# EAGLE board Qwiic-GPS-RTK2---ublox-ZED-F9P-Panel (EAGLE 9.6.0), part 1 of 3
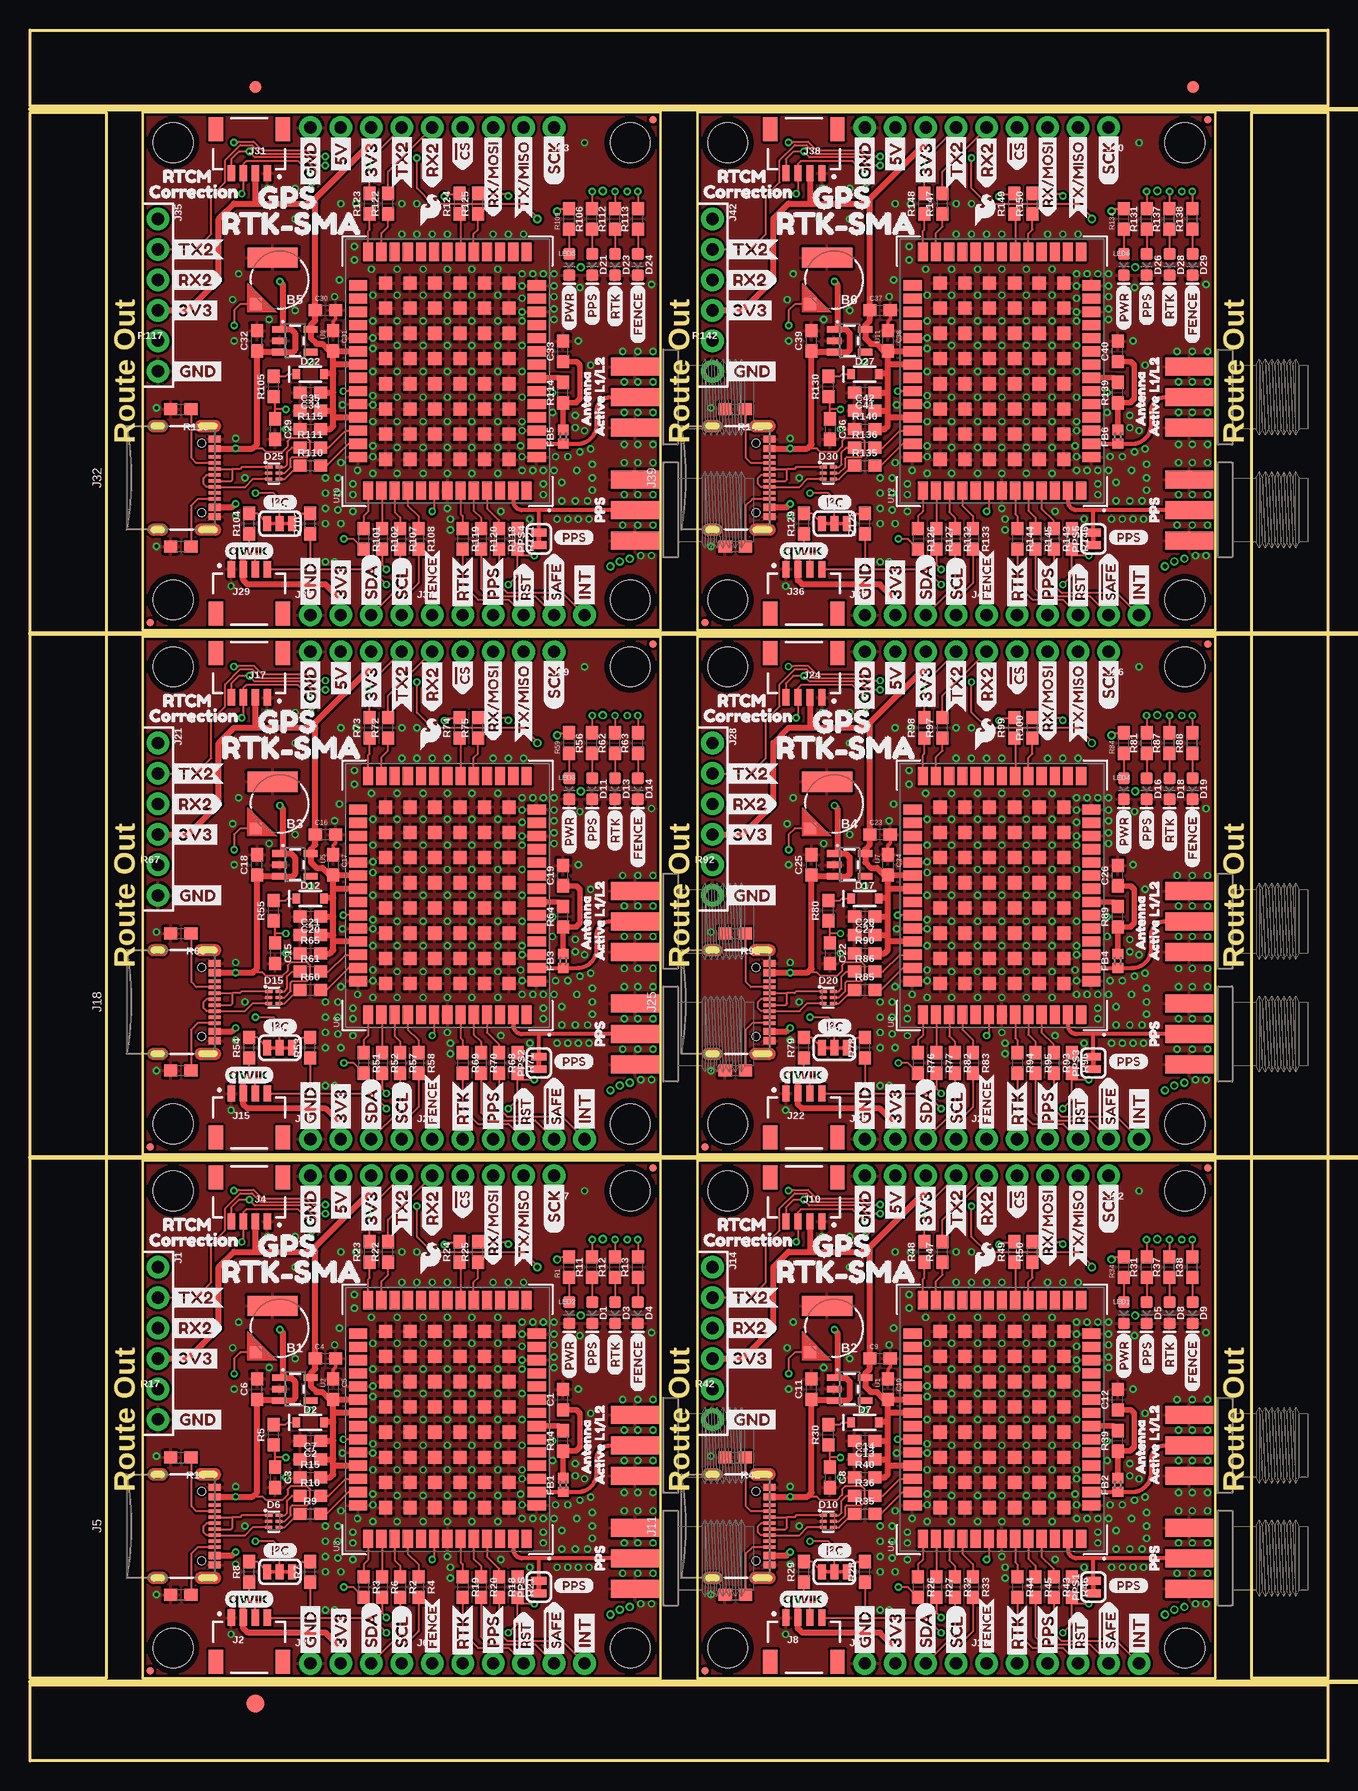
[diagram p0: board, top side]
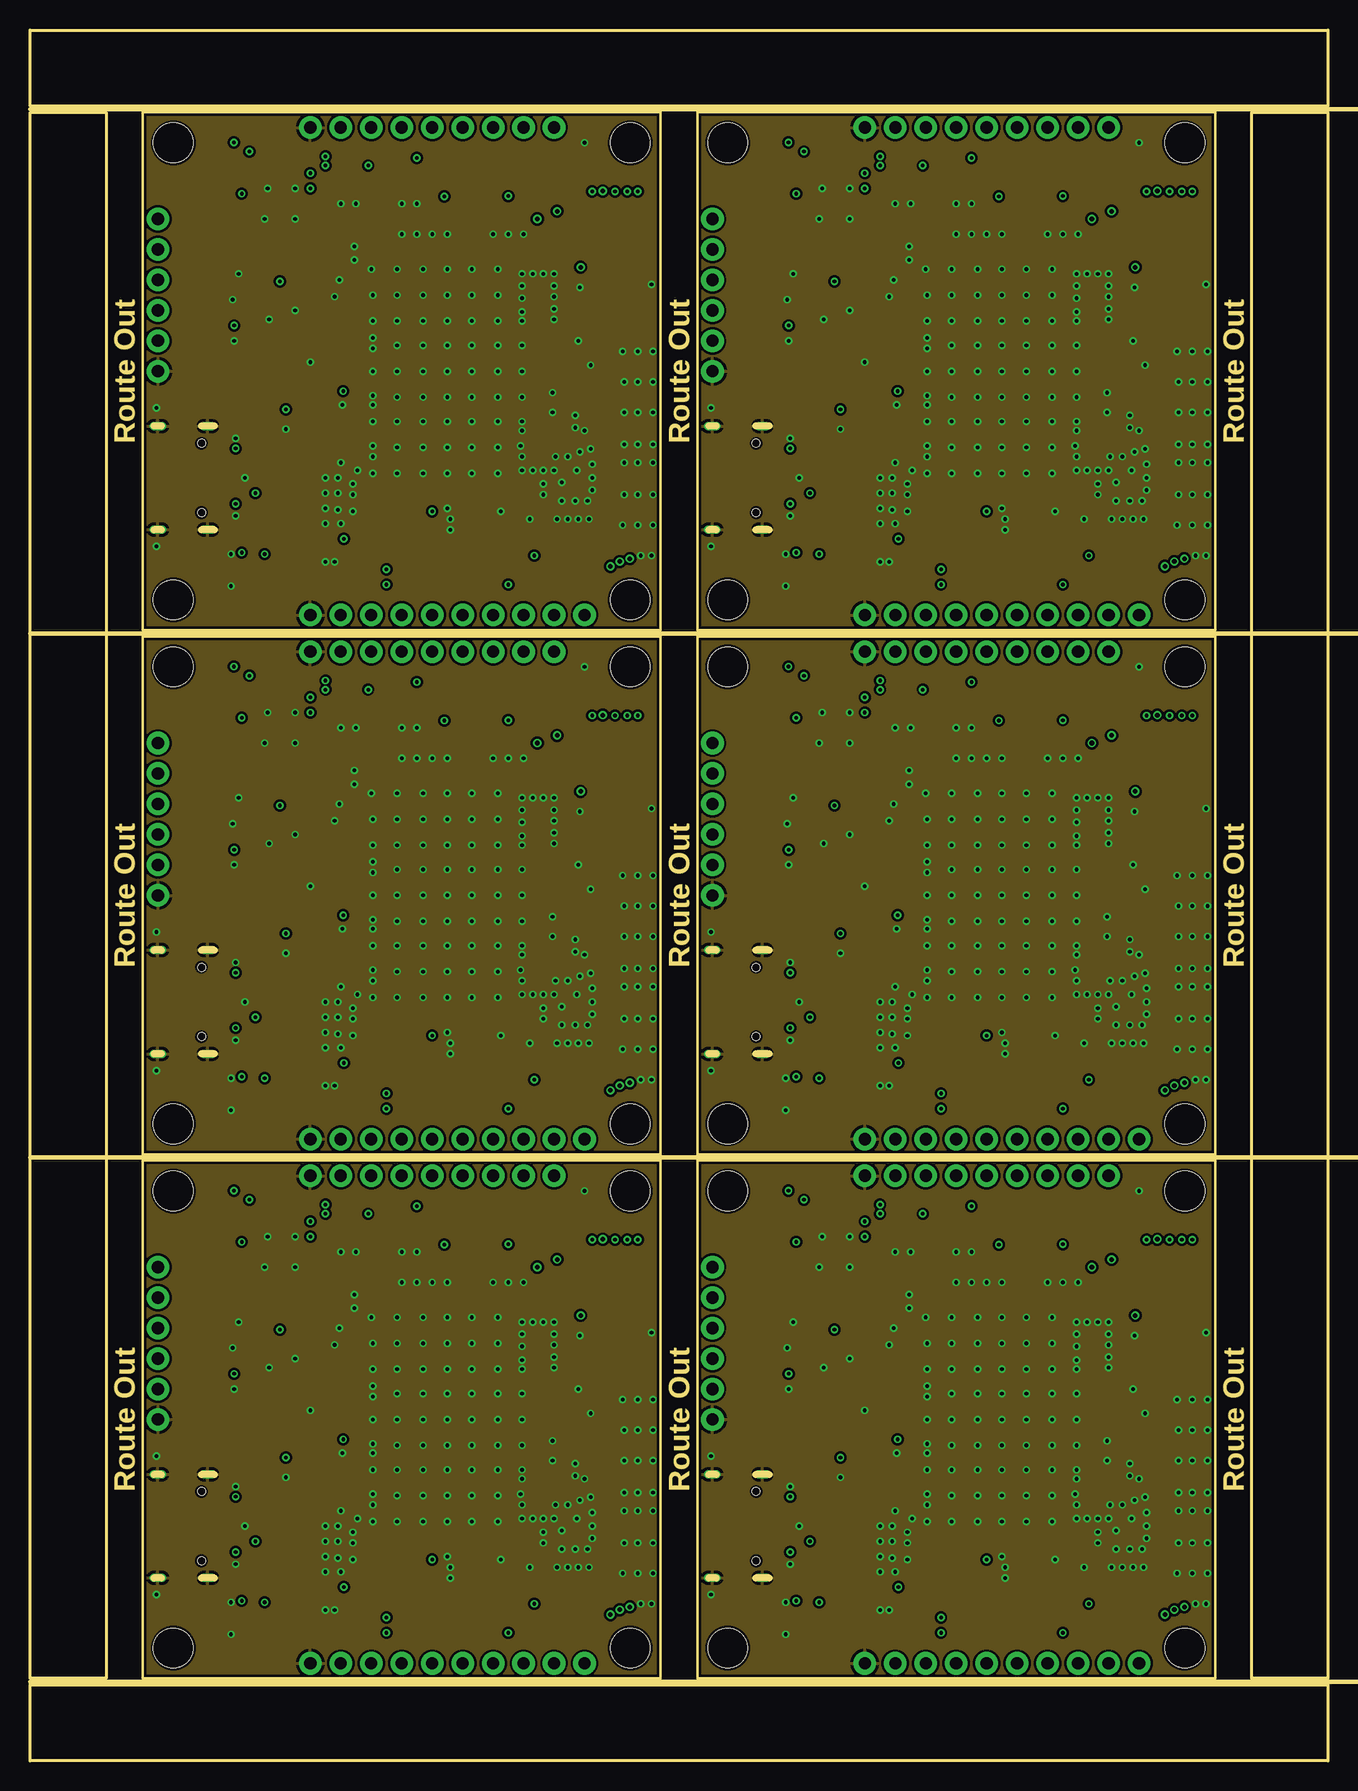
[diagram p1: board, inner layer Route2]
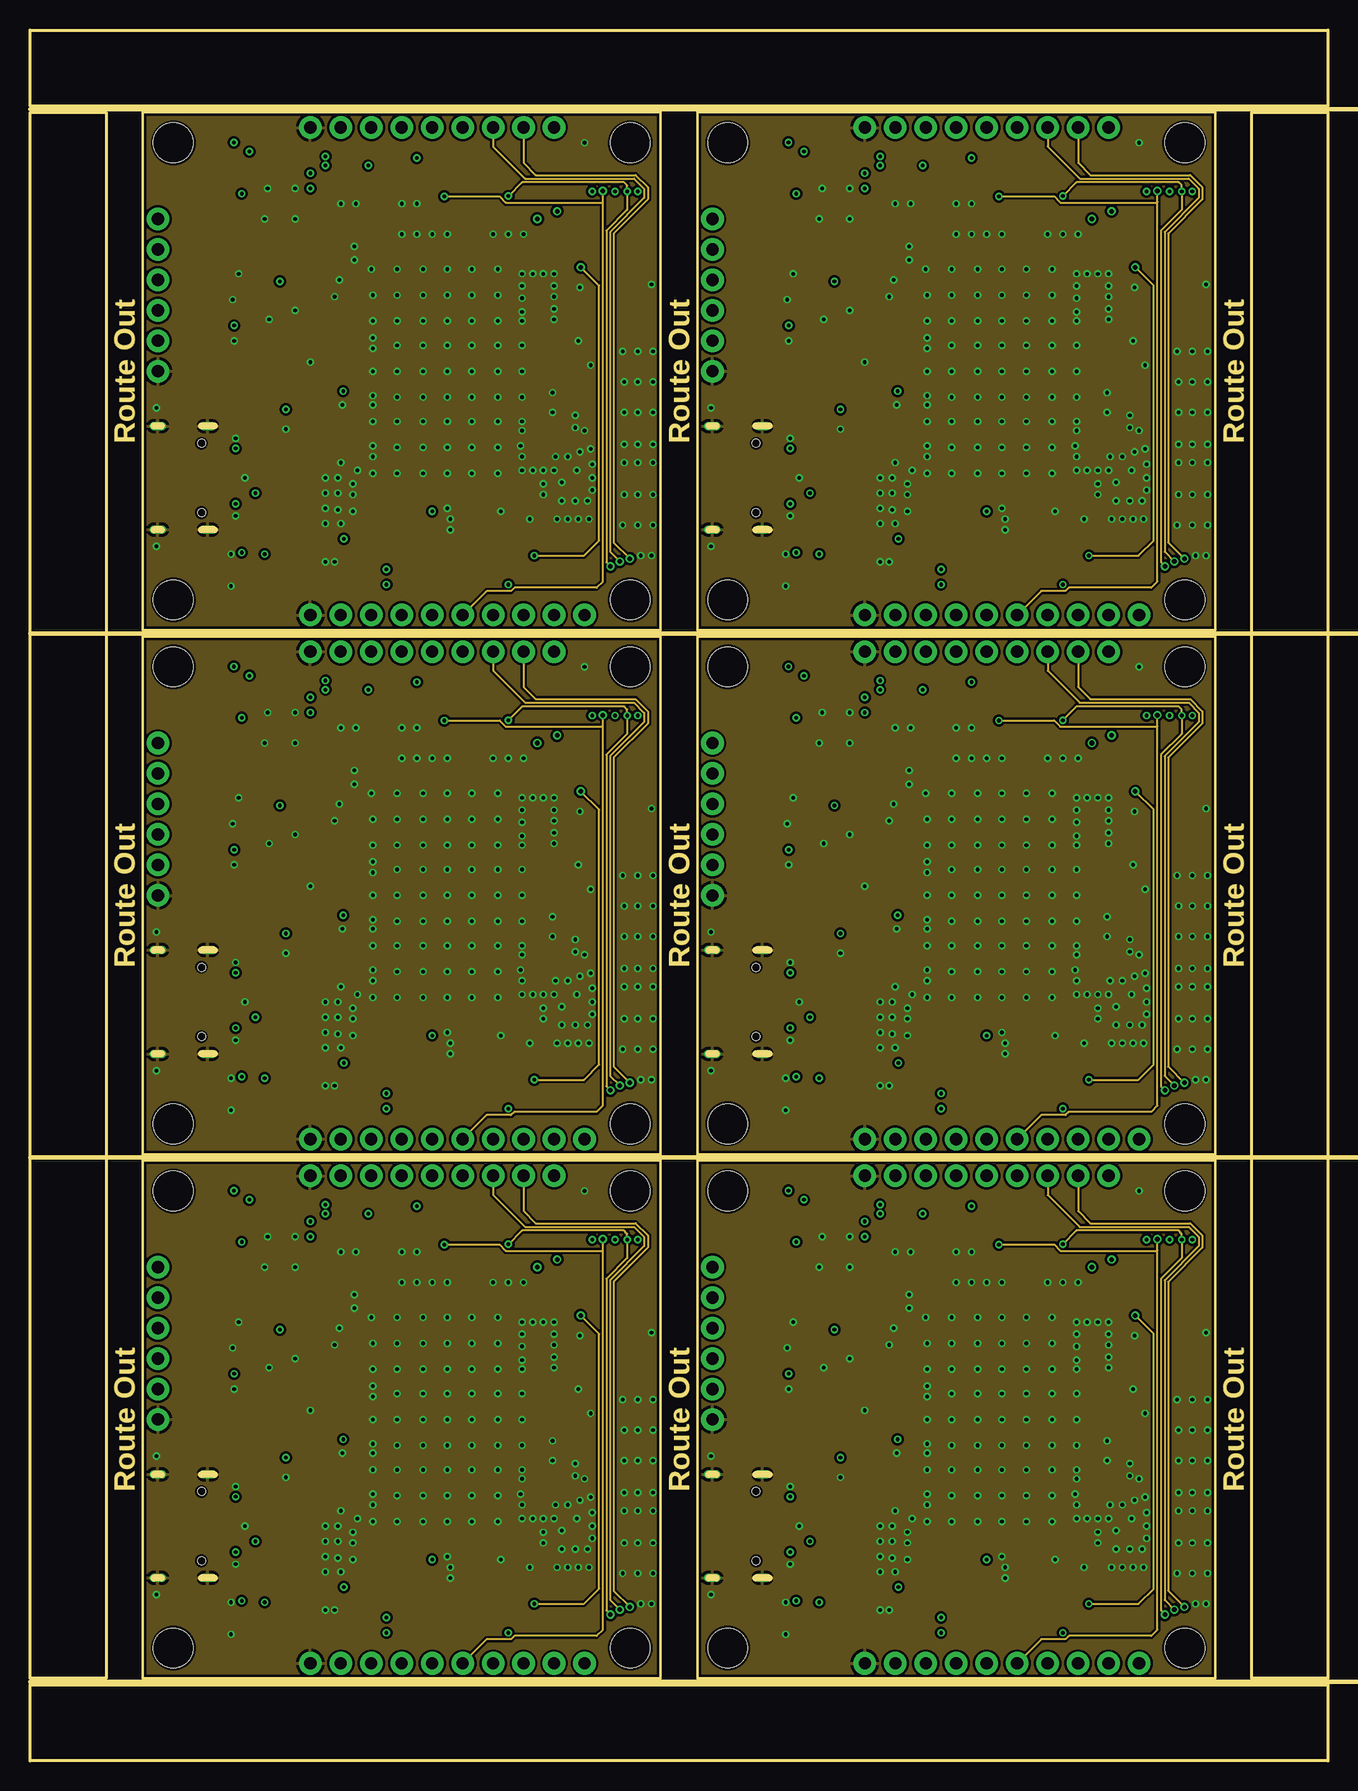
[diagram p2: board, inner layer Route15]
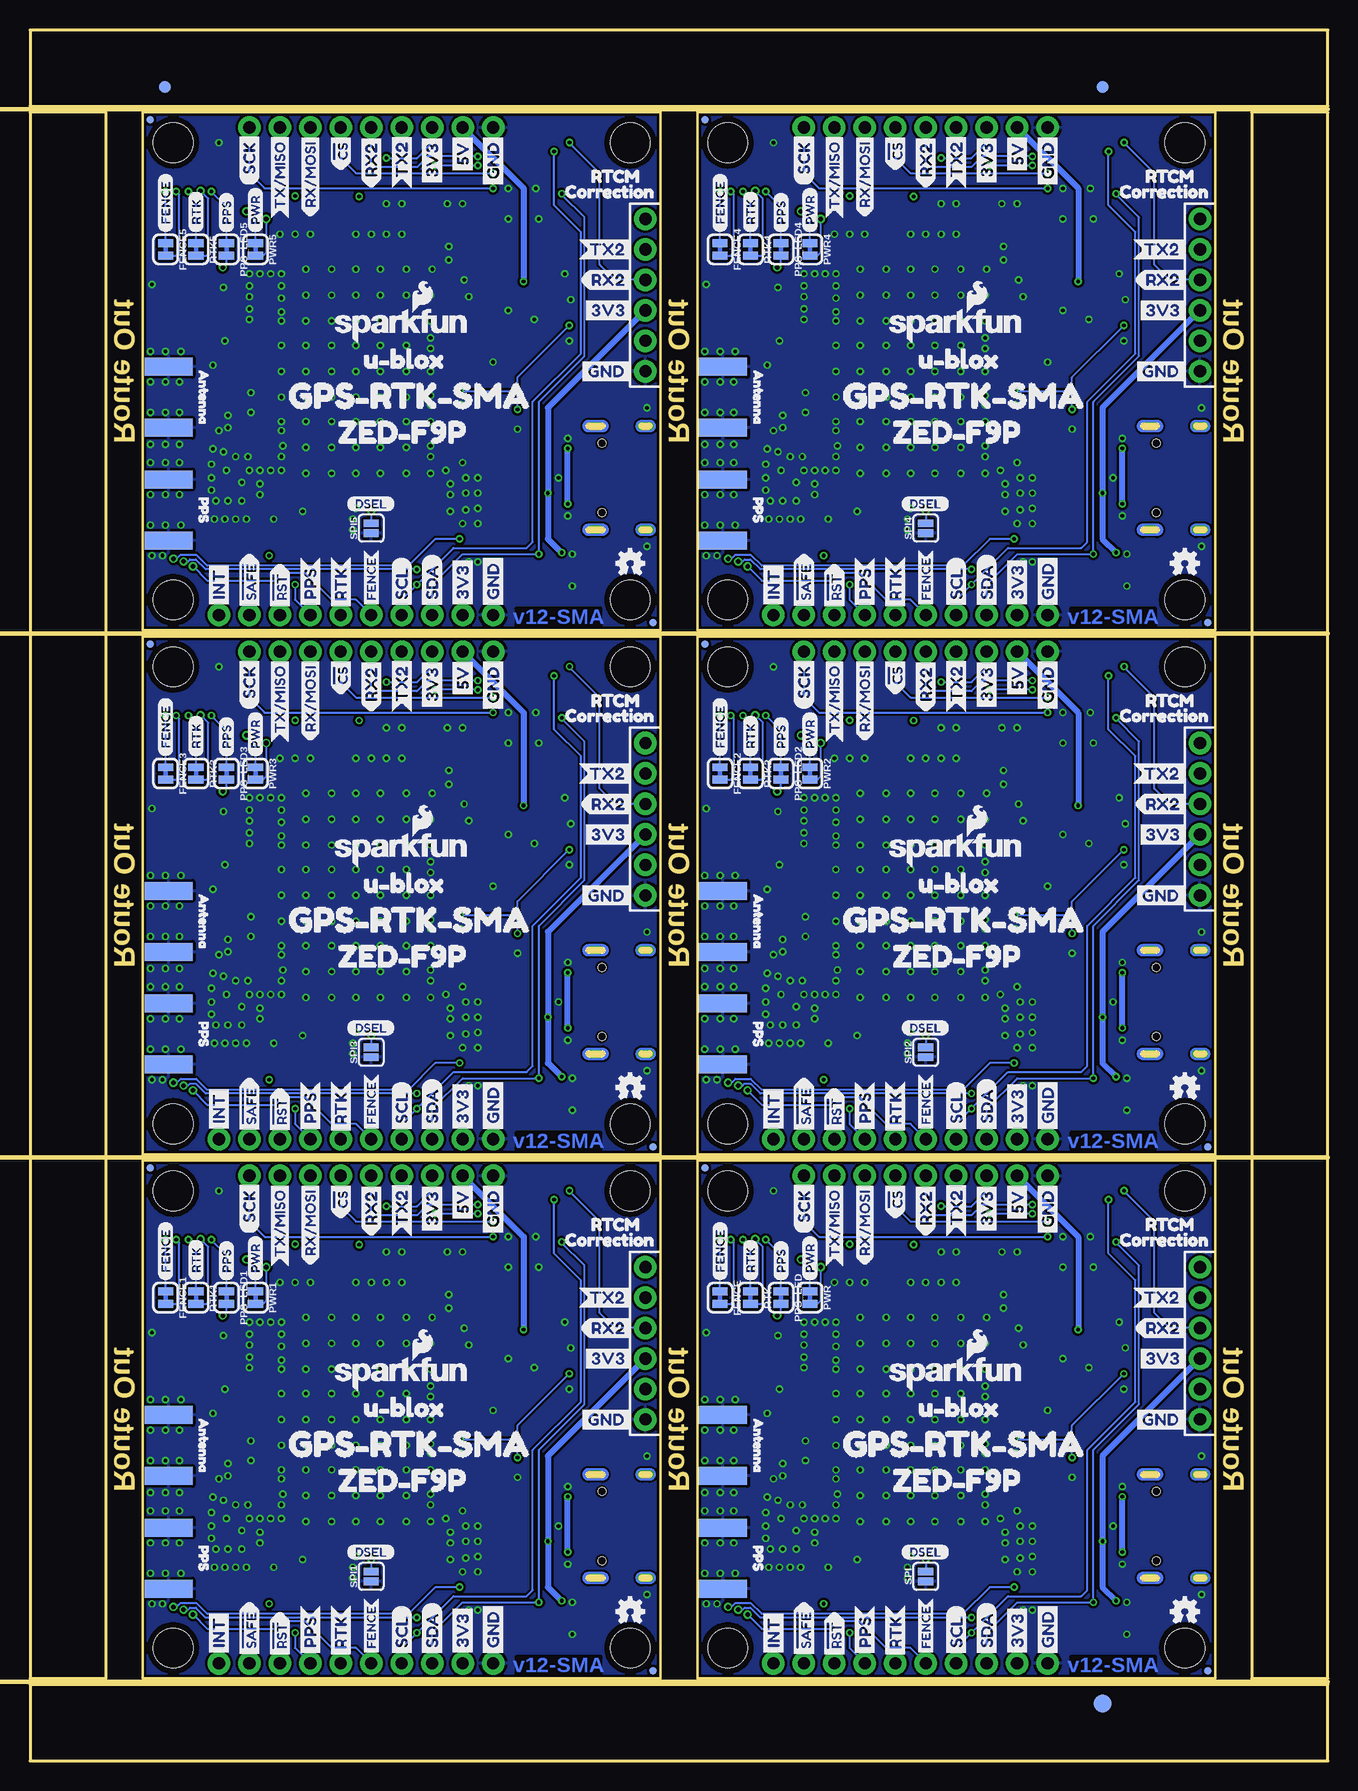
[diagram p3: board, bottom side, seen from below]

Size 108.2 x 144.27 mm. Coordinates in mm from the lower left corner, seen from the top.
Outline: 52.58,6.86 9.4,6.86 9.4,50.04 52.58,50.04 52.58,6.86
Outline: 98.81,6.86 55.63,6.86 55.63,50.04 98.81,50.04 98.81,6.86
Outline: 52.58,50.55 9.4,50.55 9.4,93.73 52.58,93.73 52.58,50.55
Outline: 98.81,50.55 55.63,50.55 55.63,93.73 98.81,93.73 98.81,50.55
Outline: 52.58,94.23 9.4,94.23 9.4,137.41 52.58,137.41 52.58,94.23
Outline: 98.81,94.23 55.63,94.23 55.63,137.41 98.81,137.41 98.81,94.23
Outline: 0,6.35 108.2,6.35 108.2,0 0,0 0,6.35
Outline: 101.85,137.41 108.2,137.41 108.2,6.86 101.85,6.86 101.85,137.41
Outline: 0,144.27 108.2,144.27 108.2,137.92 0,137.92 0,144.27
Outline: 0,137.41 6.35,137.41 6.35,6.86 0,6.86 0,137.41
Copper layers (1+2*15+16): Top 0.035mm / dielectric 1.5mm / Route2 0.035mm / dielectric 0.15mm / Route15 0.035mm / dielectric 0.2mm / Bottom 0.035mm
Design rules "Qwiic": minimum track width 4mil, minimum drill 0.2mm, track to track 4mil, track to pad 4mil, pad to pad 4mil, via to via 4mil, smd to smd 4mil, copper to edge 6mil, drill to drill 6mil, minimum pad ring 6mil, minimum via ring 6mil, stop-mask expansion 4mil, vias tented up to drill 25mil, thermal gap 10mil
Net classes: 3 RF: width 0.35 mm, clearance 0.203 mm
Milling: 4 lines

## Footprints (pad centres in the part's own frame; a part is rotated, then mirrored left to right if it is on the bottom)
ML414H_IV01E = smd 1 x 1: + 2.022,2.032 | smd 4.2 x 1.7: - 0.6,-1.85
0603 = smd 1.1 x 1: 1 -0.85,0; 2 0.85,0
LED-0603 = smd 1 x 1: A -0.877,0; C 0.877,0
SOD-323 = smd 0.63 x 0.83: A 1.15,0; C -1.15,0
SOT886 = smd 0.61 x 0.25: 1 -0.405,0.5 | smd 0.56 x 0.25: 2 -0.43,0; 3 -0.43,-0.5; 4 0.43,-0.5; 5 0.43,0; 6 0.43,0.5
SMA-EDGE = smd 1.5 x 4: GND@0 -2.54,0; GND@1 2.54,0; SIG 0,0 | smd 1.5 x 4 bottom: GND@2 -2.54,0; GND@3 2.54,0
FIDUCIAL-1X2 = smd 1 x 1: 1 0,0
FIDUCIAL-1.5X3 = smd 1.5 x 1.5: 1 0,0
0402 = smd 0.85 x 0.9: 1 -0.58,0; 2 0.58,0
SMT-JUMPER_2_NC_TRACE_SILK = smd 0.66 x 1.27: 1 -0.521,0; 2 0.521,0
1X06_NO_SILK = drill 1.016 pad 1.88: 1 0,0; 2 2.54,0; 3 5.08,0; 4 7.62,0; 5 10.16,0; 6 12.7,0
JST04_1MM_RA = smd 0.6 x 1.35: 1 -1.5,0; 2 -0.5,0; 3 0.5,0; 4 1.5,0 | smd 1.2 x 2: NC1 2.8,-3.675; NC2 -2.8,-3.675
1X04_NO_SILK = drill 1.016 pad 1.88: 1 0,0; 2 2.54,0; 3 5.08,0; 4 7.62,0
USB-C-16P-2LAYER-PADS = smd 0.3 x 1: A5 -1.25,-0.34; A6 -0.25,-0.34; A7 0.25,-0.34; A8 1.25,-0.34; B5 1.75,-0.34; B6 0.75,-0.34; B7 -0.75,-0.34; B8 -1.75,-0.34 | smd 0.6 x 1: GND -3.225,-0.34; GND2 3.225,-0.34; VBUS1 -2.45,-0.34; VBUS2 2.45,-0.34 | drill 0.4 pad 0.6 long: SHLD1 -4.318,-0.915; SHLD2 4.318,-0.915; SHLD3 -4.318,-5.095; SHLD4 4.318,-5.095 | hole 0.65: -2.89,-1.445; 2.89,-1.445
1X09_NO_SILK = drill 1.016 pad 1.88: 1 0,0; 2 2.54,0; 3 5.08,0; 4 7.62,0; 5 10.16,0; 6 12.7,0; 7 15.24,0; 8 17.78,0; 9 20.32,0
STAND-OFF = hole 3.302: 0,0
MICRO-FIDUCIAL = smd 0.635 x 0.635: 1 0,0
SMT-JUMPER_3_2-NC_TRACE_SILK = smd 0.66 x 1.27: 1 -1.041,0; 2 0,0; 3 1.041,0
SMT-JUMPER_2_NO_SILK = smd 0.635 x 1.27: 1 -0.406,0; 2 0.406,0
SOT23-5 = smd 0.55 x 1.2: 1 -0.95,-1.3; 2 0,-1.3; 3 0.95,-1.3; 4 0.95,1.3; 5 -0.95,1.3
ZED-F9P = smd 0.85 x 1.52: 1 -7.15,-7.45; 2 -6.05,-7.45; 3 -4.95,-7.45; 4 -3.85,-7.45; 5 -2.75,-7.45; 6 -1.65,-7.45; 7 -0.55,-7.45; 8 0.55,-7.45; 9 1.65,-7.45; 10 2.75,-7.45; 11 3.85,-7.45; 12 4.95,-7.45; 13 6.05,-7.45; 14 7.15,-7.45; 28 7.15,7.45; 29 6.05,7.45; 30 4.95,7.45; 31 3.85,7.45; 32 2.75,7.45; 33 1.65,7.45; 34 0.55,7.45; 35 -0.55,7.45; 36 -1.65,7.45; 37 -2.75,7.45; 38 -3.85,7.45; 39 -4.95,7.45; 40 -6.05,7.45; 41 -7.15,7.45 | smd 1.52 x 0.85: 15 9.95,-6.6; 16 9.95,-5.5; 17 9.95,-4.4; 18 9.95,-3.3; 19 9.95,-2.2; 20 9.95,-1.1; 21 9.95,0; 22 9.95,1.1; 23 9.95,2.2; 24 9.95,3.3; 25 9.95,4.4; 26 9.95,5.5; 27 9.95,6.6; 42 -9.95,6.6; 43 -9.95,5.5; 44 -9.95,4.4; 45 -9.95,3.3; 46 -9.95,2.2; 47 -9.95,1.1; 48 -9.95,0; 49 -9.95,-1.1; 50 -9.95,-2.2; 51 -9.95,-3.3; 52 -9.95,-4.4; 53 -9.95,-5.5; 54 -9.95,-6.6 | smd 1.1 x 1.1: 55 -1.05,-1.05; 56 -3.15,-1.05; 57 -5.25,-1.05; 58 -7.35,-1.05; 59 -1.05,-3.1; 60 -3.15,-3.1; 61 -5.25,-3.1; 62 -7.35,-3.1; 63 -1.05,-5.15; 64 -3.15,-5.15; 65 -5.25,-5.15; 66 -7.35,-5.15; 67 -1.05,5.15; 68 -3.15,5.15; 69 -5.25,5.15; 70 -7.35,5.15; 71 -1.05,3.1; 72 -3.15,3.1; 73 -5.25,3.1; 74 -7.35,3.1; 75 -1.05,1.05; 76 -3.15,1.05; 77 -5.25,1.05; 78 -7.35,1.05; 79 1.05,1.05; 80 3.15,1.05; 81 5.25,1.05; 82 7.35,1.05; 83 1.05,3.1; 84 3.15,3.1; 85 5.25,3.1; 86 7.35,3.1; 87 1.05,5.15; 88 3.15,5.15; 89 5.25,5.15; 90 7.35,5.15; 91 1.05,-5.15; 92 3.15,-5.15; 93 5.25,-5.15; 94 7.35,-5.15; 95 1.05,-3.1; 96 3.15,-3.1; 97 5.25,-3.1; 98 7.35,-3.1; 99 1.05,-1.05; 100 3.15,-1.05; 101 5.25,-1.05; 102 7.35,-1.05

## Placement (x,y rotation side)
B1  6.8MM_COIN_CELL  [ML414H_IV01E]  20.83,36.07 180 top
B2  6.8MM_COIN_CELL  [ML414H_IV01E]  67.06,36.07 180 top
B3  6.8MM_COIN_CELL  [ML414H_IV01E]  20.83,79.76 180 top
B4  6.8MM_COIN_CELL  [ML414H_IV01E]  67.06,79.76 180 top
B5  6.8MM_COIN_CELL  [ML414H_IV01E]  20.83,123.44 180 top
B6  6.8MM_COIN_CELL  [ML414H_IV01E]  67.06,123.44 180 top
C1  47pF  [0603]  44.45,30.1 90 top
C2  1.0uF  [0603]  23.37,26.67 180 top
C3  1.0uF  [0603]  20.45,23.62 270 top
C4  1.0uF  [0603]  24.64,33.53 0 top
C5  0.1uF  [0603]  25.27,30.99 270 top
C6  1.0uF  [0603]  18.92,30.99 90 top
C7  0.1uF  [0603]  23.37,25.15 0 top
C8  1.0uF  [0603]  66.67,23.62 270 top
C9  1.0uF  [0603]  70.87,33.53 0 top
C10  0.1uF  [0603]  71.5,30.99 270 top
C11  1.0uF  [0603]  65.15,30.99 90 top
C12  47pF  [0603]  90.68,30.1 90 top
C13  1.0uF  [0603]  69.6,26.67 180 top
C14  0.1uF  [0603]  69.6,25.15 0 top
C15  1.0uF  [0603]  20.45,67.31 270 top
C16  1.0uF  [0603]  24.64,77.22 0 top
C17  0.1uF  [0603]  25.27,74.68 270 top
C18  1.0uF  [0603]  18.92,74.68 90 top
C19  47pF  [0603]  44.45,73.79 90 top
C20  1.0uF  [0603]  23.37,70.36 180 top
C21  0.1uF  [0603]  23.37,68.83 0 top
C22  1.0uF  [0603]  66.67,67.31 270 top
C23  1.0uF  [0603]  70.87,77.22 0 top
C24  0.1uF  [0603]  71.5,74.68 270 top
C25  1.0uF  [0603]  65.15,74.68 90 top
C26  47pF  [0603]  90.68,73.79 90 top
C27  1.0uF  [0603]  69.6,70.36 180 top
C28  0.1uF  [0603]  69.6,68.83 0 top
C29  1.0uF  [0603]  20.45,111 270 top
C30  1.0uF  [0603]  24.64,120.9 0 top
C31  0.1uF  [0603]  25.27,118.36 270 top
C32  1.0uF  [0603]  18.92,118.36 90 top
C33  47pF  [0603]  44.45,117.48 90 top
C34  1.0uF  [0603]  23.37,114.05 180 top
C35  0.1uF  [0603]  23.37,112.52 0 top
C36  1.0uF  [0603]  66.67,111 270 top
C37  1.0uF  [0603]  70.87,120.9 0 top
C38  0.1uF  [0603]  71.5,118.36 270 top
C39  1.0uF  [0603]  65.15,118.36 90 top
C40  47pF  [0603]  90.68,117.48 90 top
C41  1.0uF  [0603]  69.6,114.05 180 top
C42  0.1uF  [0603]  69.6,112.52 0 top
D1  Yellow  [LED-0603]  46.86,37.34 270 top
D2  0.5A/40V/420mV  [SOD-323]  23.37,28.19 0 top
D3  GREEN  [LED-0603]  48.77,37.34 270 top
D4  BLUE  [LED-0603]  50.67,37.34 270 top
D5  Yellow  [LED-0603]  93.09,37.34 270 top
D6  PRTR5V0U2F  [SOT886]  20.32,19.94 0 top
D7  0.5A/40V/420mV  [SOD-323]  69.6,28.19 0 top
D8  GREEN  [LED-0603]  95,37.34 270 top
D9  BLUE  [LED-0603]  96.9,37.34 270 top
D10  PRTR5V0U2F  [SOT886]  66.55,19.94 0 top
D11  Yellow  [LED-0603]  46.86,81.03 270 top
D12  0.5A/40V/420mV  [SOD-323]  23.37,71.88 0 top
D13  GREEN  [LED-0603]  48.77,81.03 270 top
D14  BLUE  [LED-0603]  50.67,81.03 270 top
D15  PRTR5V0U2F  [SOT886]  20.32,63.63 0 top
D16  Yellow  [LED-0603]  93.09,81.03 270 top
D17  0.5A/40V/420mV  [SOD-323]  69.6,71.88 0 top
D18  GREEN  [LED-0603]  95,81.03 270 top
D19  BLUE  [LED-0603]  96.9,81.03 270 top
D20  PRTR5V0U2F  [SOT886]  66.55,63.63 0 top
D21  Yellow  [LED-0603]  46.86,124.71 270 top
D22  0.5A/40V/420mV  [SOD-323]  23.37,115.57 0 top
D23  GREEN  [LED-0603]  48.77,124.71 270 top
D24  BLUE  [LED-0603]  50.67,124.71 270 top
D25  PRTR5V0U2F  [SOT886]  20.32,107.31 0 top
D26  Yellow  [LED-0603]  93.09,124.71 270 top
D27  0.5A/40V/420mV  [SOD-323]  69.6,115.57 0 top
D28  GREEN  [LED-0603]  95,124.71 270 top
D29  BLUE  [LED-0603]  96.9,124.71 270 top
D30  PRTR5V0U2F  [SOT886]  66.55,107.31 0 top
E1  SMA  [SMA-EDGE]  50.42,26.29 270 top
E2  SMA  [SMA-EDGE]  50.42,16.89 270 top
E3  SMA  [SMA-EDGE]  96.65,26.29 270 top
E4  SMA  [SMA-EDGE]  96.65,16.89 270 top
E5  SMA  [SMA-EDGE]  50.42,69.98 270 top
E6  SMA  [SMA-EDGE]  50.42,60.58 270 top
E7  SMA  [SMA-EDGE]  96.65,69.98 270 top
E8  SMA  [SMA-EDGE]  96.65,60.58 270 top
E9  SMA  [SMA-EDGE]  50.42,113.67 270 top
E10  SMA  [SMA-EDGE]  50.42,104.27 270 top
E11  SMA  [SMA-EDGE]  96.65,113.67 270 top
E12  SMA  [SMA-EDGE]  96.65,104.27 270 top
E$1  [FIDUCIAL-1X2]  18.8,139.51 0 top
E$2  [FIDUCIAL-1X2]  18.8,139.51 0 bottom
E$3  [FIDUCIAL-1X2]  96.96,139.51 0 top
E$4  [FIDUCIAL-1X2]  96.96,139.51 0 bottom
E$5  [FIDUCIAL-1.5X3]  18.8,4.76 0 top
E$6  [FIDUCIAL-1.5X3]  18.8,4.76 0 bottom
FB1  120_OHM  [0402]  44.45,22.99 90 top
FB2  120_OHM  [0402]  90.68,22.99 90 top
FB3  120_OHM  [0402]  44.45,66.67 90 top
FB4  120_OHM  [0402]  90.68,66.67 90 top
FB5  120_OHM  [0402]  44.45,110.36 90 top
FB6  120_OHM  [0402]  90.68,110.36 90 top
FENCE  [SMT-JUMPER_2_NC_TRACE_SILK]  50.67,38.61 270 bottom
FENCE1  [SMT-JUMPER_2_NC_TRACE_SILK]  96.9,38.61 270 bottom
FENCE2  [SMT-JUMPER_2_NC_TRACE_SILK]  50.67,82.3 270 bottom
FENCE3  [SMT-JUMPER_2_NC_TRACE_SILK]  96.9,82.3 270 bottom
FENCE4  [SMT-JUMPER_2_NC_TRACE_SILK]  50.67,125.98 270 bottom
FENCE5  [SMT-JUMPER_2_NC_TRACE_SILK]  96.9,125.98 270 bottom
J1  Radio  [1X06_NO_SILK]  10.67,41.15 270 top
J2  Qwiic Right Angle  [JST04_1MM_RA]  18.29,11.94 0 top
J3  PTH  [1X04_NO_SILK]  23.37,8.13 0 top
J4  Qwiic Right Angle  [JST04_1MM_RA]  18.29,44.96 180 top
J5  [USB-C-16P-2LAYER-PADS]  15.75,19.56 270 top
J6  [1X06_NO_SILK]  33.53,8.13 0 top
J7  [1X09_NO_SILK]  43.69,48.77 180 top
J8  Qwiic Right Angle  [JST04_1MM_RA]  64.52,11.94 0 top
J9  PTH  [1X04_NO_SILK]  69.6,8.13 0 top
J10  Qwiic Right Angle  [JST04_1MM_RA]  64.52,44.96 180 top
J11  [USB-C-16P-2LAYER-PADS]  61.98,19.56 270 top
J12  [1X09_NO_SILK]  89.92,48.77 180 top
J13  [1X06_NO_SILK]  79.76,8.13 0 top
J14  Radio  [1X06_NO_SILK]  56.9,41.15 270 top
J15  Qwiic Right Angle  [JST04_1MM_RA]  18.29,55.63 0 top
J16  PTH  [1X04_NO_SILK]  23.37,51.82 0 top
J17  Qwiic Right Angle  [JST04_1MM_RA]  18.29,88.65 180 top
J18  [USB-C-16P-2LAYER-PADS]  15.75,63.25 270 top
J19  [1X09_NO_SILK]  43.69,92.46 180 top
J20  [1X06_NO_SILK]  33.53,51.82 0 top
J21  Radio  [1X06_NO_SILK]  10.67,84.84 270 top
J22  Qwiic Right Angle  [JST04_1MM_RA]  64.52,55.63 0 top
J23  PTH  [1X04_NO_SILK]  69.6,51.82 0 top
J24  Qwiic Right Angle  [JST04_1MM_RA]  64.52,88.65 180 top
J25  [USB-C-16P-2LAYER-PADS]  61.98,63.25 270 top
J26  [1X09_NO_SILK]  89.92,92.46 180 top
J27  [1X06_NO_SILK]  79.76,51.82 0 top
J28  Radio  [1X06_NO_SILK]  56.9,84.84 270 top
J29  Qwiic Right Angle  [JST04_1MM_RA]  18.29,99.31 0 top
J30  PTH  [1X04_NO_SILK]  23.37,95.5 0 top
J31  Qwiic Right Angle  [JST04_1MM_RA]  18.29,132.33 180 top
J32  [USB-C-16P-2LAYER-PADS]  15.75,106.93 270 top
J33  [1X09_NO_SILK]  43.69,136.14 180 top
J34  [1X06_NO_SILK]  33.53,95.5 0 top
J35  Radio  [1X06_NO_SILK]  10.67,128.52 270 top
J36  Qwiic Right Angle  [JST04_1MM_RA]  64.52,99.31 0 top
J37  PTH  [1X04_NO_SILK]  69.6,95.5 0 top
J38  Qwiic Right Angle  [JST04_1MM_RA]  64.52,132.33 180 top
J39  [USB-C-16P-2LAYER-PADS]  61.98,106.93 270 top
J40  [1X09_NO_SILK]  89.92,136.14 180 top
J41  [1X06_NO_SILK]  79.76,95.5 0 top
J42  Radio  [1X06_NO_SILK]  56.9,128.52 270 top
JP1  STAND-OFF  [STAND-OFF]  58.17,9.4 90 top
JP2  STAND-OFF  [STAND-OFF]  58.17,47.5 90 top
JP3  FIDUCIALUFIDUCIAL  [MICRO-FIDUCIAL]  98.17,49.4 90 top
JP4  FIDUCIALUFIDUCIAL  [MICRO-FIDUCIAL]  56.26,7.49 90 top
JP5  [SMT-JUMPER_3_2-NC_TRACE_SILK]  20.83,15.75 0 top
JP6  [SMT-JUMPER_3_2-NC_TRACE_SILK]  67.06,15.75 0 top
JP7  FIDUCIALUFIDUCIAL  [MICRO-FIDUCIAL]  98.17,49.4 270 bottom
JP8  FIDUCIALUFIDUCIAL  [MICRO-FIDUCIAL]  56.26,7.49 270 bottom
JP9  STAND-OFF  [STAND-OFF]  96.27,9.4 90 top
JP10  STAND-OFF  [STAND-OFF]  96.27,47.5 90 top
JP11  STAND-OFF  [STAND-OFF]  11.94,53.09 90 top
JP12  STAND-OFF  [STAND-OFF]  11.94,91.19 90 top
JP13  FIDUCIALUFIDUCIAL  [MICRO-FIDUCIAL]  51.94,93.09 90 top
JP14  FIDUCIALUFIDUCIAL  [MICRO-FIDUCIAL]  10.03,51.18 90 top
JP15  [SMT-JUMPER_3_2-NC_TRACE_SILK]  20.83,59.44 0 top
JP16  FIDUCIALUFIDUCIAL  [MICRO-FIDUCIAL]  51.94,93.09 270 bottom
JP17  FIDUCIALUFIDUCIAL  [MICRO-FIDUCIAL]  10.03,51.18 270 bottom
JP18  STAND-OFF  [STAND-OFF]  50.04,53.09 90 top
JP19  STAND-OFF  [STAND-OFF]  50.04,91.19 90 top
JP20  STAND-OFF  [STAND-OFF]  58.17,53.09 90 top
JP21  FIDUCIALUFIDUCIAL  [MICRO-FIDUCIAL]  51.94,49.4 90 top
JP22  STAND-OFF  [STAND-OFF]  58.17,91.19 90 top
JP23  FIDUCIALUFIDUCIAL  [MICRO-FIDUCIAL]  98.17,93.09 90 top
JP24  FIDUCIALUFIDUCIAL  [MICRO-FIDUCIAL]  56.26,51.18 90 top
JP25  [SMT-JUMPER_3_2-NC_TRACE_SILK]  67.06,59.44 0 top
JP26  FIDUCIALUFIDUCIAL  [MICRO-FIDUCIAL]  98.17,93.09 270 bottom
JP27  FIDUCIALUFIDUCIAL  [MICRO-FIDUCIAL]  56.26,51.18 270 bottom
JP28  STAND-OFF  [STAND-OFF]  96.27,53.09 90 top
JP29  STAND-OFF  [STAND-OFF]  96.27,91.19 90 top
JP30  STAND-OFF  [STAND-OFF]  11.94,96.77 90 top
JP31  STAND-OFF  [STAND-OFF]  11.94,9.4 90 top
JP32  STAND-OFF  [STAND-OFF]  11.94,134.87 90 top
JP33  FIDUCIALUFIDUCIAL  [MICRO-FIDUCIAL]  51.94,136.78 90 top
JP34  FIDUCIALUFIDUCIAL  [MICRO-FIDUCIAL]  10.03,94.87 90 top
JP35  [SMT-JUMPER_3_2-NC_TRACE_SILK]  20.83,103.12 0 top
JP36  FIDUCIALUFIDUCIAL  [MICRO-FIDUCIAL]  51.94,136.78 270 bottom
JP37  FIDUCIALUFIDUCIAL  [MICRO-FIDUCIAL]  10.03,94.87 270 bottom
JP38  STAND-OFF  [STAND-OFF]  50.04,96.77 90 top
JP39  STAND-OFF  [STAND-OFF]  50.04,134.87 90 top
JP40  STAND-OFF  [STAND-OFF]  58.17,96.77 90 top
JP41  STAND-OFF  [STAND-OFF]  11.94,47.5 90 top
JP42  STAND-OFF  [STAND-OFF]  58.17,134.87 90 top
JP43  FIDUCIALUFIDUCIAL  [MICRO-FIDUCIAL]  98.17,136.78 90 top
JP44  FIDUCIALUFIDUCIAL  [MICRO-FIDUCIAL]  56.26,94.87 90 top
JP45  [SMT-JUMPER_3_2-NC_TRACE_SILK]  67.06,103.12 0 top
JP46  FIDUCIALUFIDUCIAL  [MICRO-FIDUCIAL]  98.17,136.78 270 bottom
JP47  FIDUCIALUFIDUCIAL  [MICRO-FIDUCIAL]  56.26,94.87 270 bottom
JP48  STAND-OFF  [STAND-OFF]  96.27,96.77 90 top
JP49  STAND-OFF  [STAND-OFF]  96.27,134.87 90 top
JP61  FIDUCIALUFIDUCIAL  [MICRO-FIDUCIAL]  10.03,7.49 90 top
JP71  FIDUCIALUFIDUCIAL  [MICRO-FIDUCIAL]  51.94,49.4 270 bottom
JP81  FIDUCIALUFIDUCIAL  [MICRO-FIDUCIAL]  10.03,7.49 270 bottom
JP91  STAND-OFF  [STAND-OFF]  50.04,9.4 90 top
JP101  STAND-OFF  [STAND-OFF]  50.04,47.5 90 top
LED1  RED  [LED-0603]  91.19,37.34 270 top
LED2  RED  [LED-0603]  44.96,37.34 270 top
LED3  RED  [LED-0603]  44.96,81.03 270 top
LED4  RED  [LED-0603]  91.19,81.03 270 top
LED5  RED  [LED-0603]  44.96,124.71 270 top
LED6  RED  [LED-0603]  91.19,124.71 270 top
LOGO1  OSHW-LOGOMINI  [OSHW-LOGO-MINI]  11.94,12.45 0 bottom
LOGO2  SFE_LOGO_NAME_FLAME.1_INCH  [SFE_LOGO_NAME_FLAME_.1]  30.99,32.26 0 bottom
LOGO3  OSHW-LOGOMINI  [OSHW-LOGO-MINI]  58.17,12.45 0 bottom
LOGO4  SFE_LOGO_NAME_FLAME.1_INCH  [SFE_LOGO_NAME_FLAME_.1]  77.22,32.26 0 bottom
LOGO5  OSHW-LOGOMINI  [OSHW-LOGO-MINI]  11.94,56.13 0 bottom
LOGO6  SFE_LOGO_NAME_FLAME.1_INCH  [SFE_LOGO_NAME_FLAME_.1]  30.99,75.95 0 bottom
LOGO7  OSHW-LOGOMINI  [OSHW-LOGO-MINI]  58.17,56.13 0 bottom
LOGO8  SFE_LOGO_NAME_FLAME.1_INCH  [SFE_LOGO_NAME_FLAME_.1]  77.22,75.95 0 bottom
LOGO9  OSHW-LOGOMINI  [OSHW-LOGO-MINI]  11.94,99.82 0 bottom
LOGO10  SFE_LOGO_NAME_FLAME.1_INCH  [SFE_LOGO_NAME_FLAME_.1]  30.99,119.63 0 bottom
LOGO11  OSHW-LOGOMINI  [OSHW-LOGO-MINI]  58.17,99.82 0 bottom
LOGO12  SFE_LOGO_NAME_FLAME.1_INCH  [SFE_LOGO_NAME_FLAME_.1]  77.22,119.63 0 bottom
PPS  [SMT-JUMPER_2_NC_TRACE_SILK]  42.42,14.48 90 top
PPS1  [SMT-JUMPER_2_NC_TRACE_SILK]  88.65,14.48 90 top
PPS2  [SMT-JUMPER_2_NC_TRACE_SILK]  42.42,58.17 90 top
PPS3  [SMT-JUMPER_2_NC_TRACE_SILK]  88.65,58.17 90 top
PPS4  [SMT-JUMPER_2_NC_TRACE_SILK]  42.42,101.85 90 top
PPS5  [SMT-JUMPER_2_NC_TRACE_SILK]  88.65,101.85 90 top
PPS_LED  [SMT-JUMPER_2_NC_TRACE_SILK]  45.59,38.61 270 bottom
PPS_LED1  [SMT-JUMPER_2_NC_TRACE_SILK]  91.82,38.61 270 bottom
PPS_LED2  [SMT-JUMPER_2_NC_TRACE_SILK]  45.59,82.3 270 bottom
PPS_LED3  [SMT-JUMPER_2_NC_TRACE_SILK]  91.82,82.3 270 bottom
PPS_LED4  [SMT-JUMPER_2_NC_TRACE_SILK]  45.59,125.98 270 bottom
PPS_LED5  [SMT-JUMPER_2_NC_TRACE_SILK]  91.82,125.98 270 bottom
PWR  [SMT-JUMPER_2_NC_TRACE_SILK]  43.18,38.61 270 bottom
PWR1  [SMT-JUMPER_2_NC_TRACE_SILK]  89.41,38.61 270 bottom
PWR2  [SMT-JUMPER_2_NC_TRACE_SILK]  43.18,82.3 270 bottom
PWR3  [SMT-JUMPER_2_NC_TRACE_SILK]  89.41,82.3 270 bottom
PWR4  [SMT-JUMPER_2_NC_TRACE_SILK]  43.18,125.98 270 bottom
PWR5  [SMT-JUMPER_2_NC_TRACE_SILK]  89.41,125.98 270 bottom
R1  1k  [0603]  44.96,41.15 90 top
R2  33  [0603]  30.86,14.48 270 top
R3  33  [0603]  27.81,14.48 270 top
R4  33  [0603]  32.38,14.48 270 top
R5  1k  [0603]  20.32,27.18 90 top
R6  33  [0603]  29.34,14.48 270 top
R7  2.2k  [0603]  23.37,15.75 90 top
R8  2.2k  [0603]  18.29,15.75 90 top
R9  27  [0603]  23.37,20.57 0 top
R10  27  [0603]  23.37,22.1 0 top
R11  1k  [0603]  46.86,41.15 90 top
R12  1k  [0603]  48.77,41.15 90 top
R13  1k  [0603]  50.67,41.15 90 top
R14  10  [0603]  44.45,26.67 90 top
R15  100k  [0603]  23.37,23.62 0 top
R16  5.1k  [0603]  12.57,13.84 0 top
R17  5.1k  [0603]  12.57,25.27 0 top
R18  33  [0603]  39.12,14.48 270 top
R19  33  [0603]  36.07,14.48 270 top
R20  33  [0603]  37.59,14.48 270 top
R21  33  [0603]  40.64,14.48 270 top
R22  33  [0603]  29.84,42.42 90 top
R23  33  [0603]  28.32,42.42 90 top
R24  33  [0603]  35.81,42.42 90 top
R25  33  [0603]  37.34,42.42 90 top
R26  33  [0603]  74.04,14.48 270 top
R27  33  [0603]  75.56,14.48 270 top
R28  2.2k  [0603]  69.6,15.75 90 top
R29  2.2k  [0603]  64.52,15.75 90 top
R30  1k  [0603]  66.55,27.18 90 top
R31  1k  [0603]  93.09,41.15 90 top
R32  33  [0603]  77.09,14.48 270 top
R33  33  [0603]  78.61,14.48 270 top
R34  1k  [0603]  91.19,41.15 90 top
R35  27  [0603]  69.6,20.57 0 top
R36  27  [0603]  69.6,22.1 0 top
R37  1k  [0603]  95,41.15 90 top
R38  1k  [0603]  96.9,41.15 90 top
R39  10  [0603]  90.68,26.67 90 top
R40  100k  [0603]  69.6,23.62 0 top
R41  5.1k  [0603]  58.8,13.84 0 top
R42  5.1k  [0603]  58.8,25.27 0 top
R43  33  [0603]  85.34,14.48 270 top
R44  33  [0603]  82.3,14.48 270 top
R45  33  [0603]  83.82,14.48 270 top
R46  33  [0603]  86.87,14.48 270 top
R47  33  [0603]  76.07,42.42 90 top
R48  33  [0603]  74.55,42.42 90 top
R49  33  [0603]  82.04,42.42 90 top
R50  33  [0603]  83.57,42.42 90 top
R51  33  [0603]  27.81,58.17 270 top
R52  33  [0603]  29.34,58.17 270 top
R53  2.2k  [0603]  23.37,59.44 90 top
R54  2.2k  [0603]  18.29,59.44 90 top
R55  1k  [0603]  20.32,70.87 90 top
R56  1k  [0603]  46.86,84.84 90 top
R57  33  [0603]  30.86,58.17 270 top
R58  33  [0603]  32.38,58.17 270 top
R59  1k  [0603]  44.96,84.84 90 top
R60  27  [0603]  23.37,64.26 0 top
R61  27  [0603]  23.37,65.79 0 top
R62  1k  [0603]  48.77,84.84 90 top
R63  1k  [0603]  50.67,84.84 90 top
R64  10  [0603]  44.45,70.36 90 top
R65  100k  [0603]  23.37,67.31 0 top
R66  5.1k  [0603]  12.57,57.53 0 top
R67  5.1k  [0603]  12.57,68.96 0 top
R68  33  [0603]  39.12,58.17 270 top
R69  33  [0603]  36.07,58.17 270 top
R70  33  [0603]  37.59,58.17 270 top
R71  33  [0603]  40.64,58.17 270 top
R72  33  [0603]  29.84,86.11 90 top
R73  33  [0603]  28.32,86.11 90 top
R74  33  [0603]  35.81,86.11 90 top
R75  33  [0603]  37.34,86.11 90 top
R76  33  [0603]  74.04,58.17 270 top
R77  33  [0603]  75.56,58.17 270 top
R78  2.2k  [0603]  69.6,59.44 90 top
R79  2.2k  [0603]  64.52,59.44 90 top
R80  1k  [0603]  66.55,70.87 90 top
R81  1k  [0603]  93.09,84.84 90 top
R82  33  [0603]  77.09,58.17 270 top
R83  33  [0603]  78.61,58.17 270 top
R84  1k  [0603]  91.19,84.84 90 top
R85  27  [0603]  69.6,64.26 0 top
R86  27  [0603]  69.6,65.79 0 top
R87  1k  [0603]  95,84.84 90 top
R88  1k  [0603]  96.9,84.84 90 top
R89  10  [0603]  90.68,70.36 90 top
R90  100k  [0603]  69.6,67.31 0 top
R91  5.1k  [0603]  58.8,57.53 0 top
R92  5.1k  [0603]  58.8,68.96 0 top
R93  33  [0603]  85.34,58.17 270 top
R94  33  [0603]  82.3,58.17 270 top
R95  33  [0603]  83.82,58.17 270 top
R96  33  [0603]  86.87,58.17 270 top
R97  33  [0603]  76.07,86.11 90 top
R98  33  [0603]  74.55,86.11 90 top
R99  33  [0603]  82.04,86.11 90 top
R100  33  [0603]  83.57,86.11 90 top
R101  33  [0603]  27.81,101.85 270 top
R102  33  [0603]  29.34,101.85 270 top
R103  2.2k  [0603]  23.37,103.12 90 top
R104  2.2k  [0603]  18.29,103.12 90 top
R105  1k  [0603]  20.32,114.55 90 top
R106  1k  [0603]  46.86,128.52 90 top
R107  33  [0603]  30.86,101.85 270 top
R108  33  [0603]  32.38,101.85 270 top
R109  1k  [0603]  44.96,128.52 90 top
R110  27  [0603]  23.37,107.95 0 top
R111  27  [0603]  23.37,109.47 0 top
R112  1k  [0603]  48.77,128.52 90 top
R113  1k  [0603]  50.67,128.52 90 top
R114  10  [0603]  44.45,114.05 90 top
R115  100k  [0603]  23.37,111 0 top
R116  5.1k  [0603]  12.57,101.22 0 top
R117  5.1k  [0603]  12.57,112.65 0 top
R118  33  [0603]  39.12,101.85 270 top
R119  33  [0603]  36.07,101.85 270 top
R120  33  [0603]  37.59,101.85 270 top
R121  33  [0603]  40.64,101.85 270 top
R122  33  [0603]  29.84,129.79 90 top
R123  33  [0603]  28.32,129.79 90 top
R124  33  [0603]  35.81,129.79 90 top
R125  33  [0603]  37.34,129.79 90 top
R126  33  [0603]  74.04,101.85 270 top
R127  33  [0603]  75.56,101.85 270 top
R128  2.2k  [0603]  69.6,103.12 90 top
R129  2.2k  [0603]  64.52,103.12 90 top
R130  1k  [0603]  66.55,114.55 90 top
R131  1k  [0603]  93.09,128.52 90 top
R132  33  [0603]  77.09,101.85 270 top
R133  33  [0603]  78.61,101.85 270 top
R134  1k  [0603]  91.19,128.52 90 top
R135  27  [0603]  69.6,107.95 0 top
R136  27  [0603]  69.6,109.47 0 top
R137  1k  [0603]  95,128.52 90 top
R138  1k  [0603]  96.9,128.52 90 top
R139  10  [0603]  90.68,114.05 90 top
R140  100k  [0603]  69.6,111 0 top
R141  5.1k  [0603]  58.8,101.22 0 top
R142  5.1k  [0603]  58.8,112.65 0 top
R143  33  [0603]  85.34,101.85 270 top
R144  33  [0603]  82.3,101.85 270 top
R145  33  [0603]  83.82,101.85 270 top
R146  33  [0603]  86.87,101.85 270 top
R147  33  [0603]  76.07,129.79 90 top
R148  33  [0603]  74.55,129.79 90 top
R149  33  [0603]  82.04,129.79 90 top
R150  33  [0603]  83.57,129.79 90 top
RTK  [SMT-JUMPER_2_NC_TRACE_SILK]  48.13,38.61 270 bottom
RTK1  [SMT-JUMPER_2_NC_TRACE_SILK]  94.36,38.61 270 bottom
RTK2  [SMT-JUMPER_2_NC_TRACE_SILK]  48.13,82.3 270 bottom
RTK3  [SMT-JUMPER_2_NC_TRACE_SILK]  94.36,82.3 270 bottom
RTK4  [SMT-JUMPER_2_NC_TRACE_SILK]  48.13,125.98 270 bottom
RTK5  [SMT-JUMPER_2_NC_TRACE_SILK]  94.36,125.98 270 bottom
SPI  [SMT-JUMPER_2_NO_SILK]  33.53,15.37 90 bottom
SPI1  [SMT-JUMPER_2_NO_SILK]  79.76,15.37 90 bottom
SPI2  [SMT-JUMPER_2_NO_SILK]  33.53,59.05 90 bottom
SPI3  [SMT-JUMPER_2_NO_SILK]  79.76,59.05 90 bottom
SPI4  [SMT-JUMPER_2_NO_SILK]  33.53,102.74 90 bottom
SPI5  [SMT-JUMPER_2_NO_SILK]  79.76,102.74 90 bottom
U1  3.3V  [SOT23-5]  68.33,30.99 270 top
U2  3.3V  [SOT23-5]  22.1,30.99 270 top
U3  ZED-F9P  [ZED-F9P]  34.8,28.45 90 top
U4  ZED-F9P  [ZED-F9P]  81.03,28.45 90 top
U5  3.3V  [SOT23-5]  22.1,74.68 270 top
U6  ZED-F9P  [ZED-F9P]  34.8,72.14 90 top
U7  3.3V  [SOT23-5]  68.33,74.68 270 top
U8  ZED-F9P  [ZED-F9P]  81.03,72.14 90 top
U9  3.3V  [SOT23-5]  22.1,118.36 270 top
U10  ZED-F9P  [ZED-F9P]  34.8,115.82 90 top
U11  3.3V  [SOT23-5]  68.33,118.36 270 top
U12  ZED-F9P  [ZED-F9P]  81.03,115.82 90 top
U$1  [SDA-[)]  28.45,8.51 90 top
U$2  [SDA-[)]  74.68,8.51 90 top
U$3  [SCL-[)]  30.99,8.51 90 top
U$4  [SDA-[)]  28.45,8.51 90 bottom
U$5  [SCL-[)]  30.99,8.51 90 bottom
U$6  [3V3-04]  25.91,8.51 90 top
U$7  [3V3-04]  25.91,8.51 90 bottom
U$8  [GND-04]  23.37,8.51 90 top
U$9  [GND-04]  23.37,8.51 90 bottom
U$10  [I_SUPER2_C-()-03]  19.43,17.53 0 top
U$11  [FENCE2]  50.67,30.73 90 top
U$12  [PWR-()-03]  43.18,40 90 bottom
U$13  [RTK1]  48.77,32.13 90 top
U$14  [FENCE0]  33.53,8.64 90 top
U$15  [INT8]  46.23,8.51 90 top
U$16  [INT8]  46.23,8.51 90 bottom
U$17  [FENCE0]  33.53,8.64 90 bottom
U$18  [PWR-()-03]  44.96,31.88 90 top
U$19  [5V]  25.91,44.7 90 top
U$20  [5V]  25.91,44.7 90 bottom
U$21  [RX20]  33.53,43.69 90 top
U$22  [U#BLOX3]  35.56,29.46 0 bottom
U$23  [CS#-<]]  36.07,44.96 90 top
U$24  [CS#-<]]  36.07,44.96 90 bottom
U$25  [PPS0]  45.59,40 90 bottom
U$26  [RX#MOSI3]  38.61,41.27 90 top
U$27  [DSEL0]  35.56,17.4 0 bottom
U$28  [RTK1]  36.07,8.38 90 bottom
U$29  [RTK1]  36.07,8.38 90 top
U$30  [QWIIC_4MM]  18.29,13.46 0 top
U$31  [RX#MOSI3]  38.61,41.27 90 bottom
U$32  [RTK1]  48.13,40 90 bottom
U$33  [SFE_LOGO_FLAME_.1]  33.4,41.91 0 top
U$34  [TX#MISO1]  41.15,41.15 90 top
U$35  [#RST3]  41.15,8.25 90 top
U$36  [#RST3]  41.15,8.25 90 bottom
U$37  [TX#MISO1]  41.15,41.15 90 bottom
U$38  [SCK-(]-04]  43.69,43.94 90 top
U$39  [#SAFE1]  43.69,8.25 90 top
U$40  [#SAFE1]  43.69,8.25 90 bottom
U$41  [SCK-(]-04]  43.69,43.94 90 bottom
U$42  [RX22]  11.43,36.07 0 top
U$43  [PPS5]  38.61,8.51 90 top
U$44  [PPS5]  38.61,8.51 90 bottom
U$45  [GND3]  11.56,28.45 0 top
U$46  [SCL-[)]  77.22,8.51 90 top
U$47  [PPS1]  47.5,15.11 90 top
U$48  [RTCM5]  16.13,44.7 0 bottom
U$49  [ZED#F9P6]  37.85,23.37 0 bottom
U$50  [TX21]  30.99,43.69 90 top
U$51  [TX23]  11.43,38.61 0 top
U$52  [PPS0]  46.86,32.26 90 top
U$53  [CORRECTION0]  18.29,43.43 0 bottom
U$54  [FENCE2]  50.67,40 90 bottom
U$55  [TX21]  30.99,43.69 90 bottom
U$56  [RX20]  33.53,43.69 90 bottom
U$57  [TX21]  16.26,38.61 0 bottom
U$58  [RX20]  16.13,36.07 0 bottom
U$59  [GPS0]  17.4,42.93 0 top
U$60  [3V3-04]  28.45,43.69 90 bottom
U$61  [3V3-04]  28.45,43.69 90 top
U$62  [GND-04]  23.37,43.56 90 bottom
U$63  [GND-04]  23.37,43.56 90 top
U$64  [SDA-[)]  74.68,8.51 90 bottom
U$65  [ACTIVE_L1#L21]  47.5,22.35 90 top
U$66  [3V3-04]  11.43,33.53 0 top
U$67  [3V3-04]  16.13,33.53 0 bottom
U$68  [GND3]  16.38,28.45 0 bottom
U$69  [CORRECTION0]  9.02,43.43 0 top
U$70  [RTCM5]  10.16,44.7 0 top
U$71  [ANTENNA2]  46.36,23.24 90 top
U$72  [PPS0]  43.69,14.61 0 top
U$73  [RTK#SMA4]  14.35,40.77 0 top
U$74  [PPS1]  47.5,18.67 270 bottom
U$75  [ANTENNA2]  47.5,29.21 270 bottom
U$76  [GPS#RTK#SMA5]  42.29,26.42 0 bottom
U$77  [SCL-[)]  77.22,8.51 90 bottom
U$78  [3V3-04]  72.14,8.51 90 top
U$79  [3V3-04]  72.14,8.51 90 bottom
U$80  [GND-04]  69.6,8.51 90 top
U$81  [GND-04]  69.6,8.51 90 bottom
U$82  [I_SUPER2_C-()-03]  65.66,17.53 0 top
U$83  [INT8]  92.46,8.51 90 top
U$84  [INT8]  92.46,8.51 90 bottom
U$85  [U#BLOX3]  81.79,29.46 0 bottom
U$86  [#RST3]  87.38,8.25 90 top
U$87  [#RST3]  87.38,8.25 90 bottom
U$88  [#SAFE1]  89.92,8.25 90 top
U$89  [#SAFE1]  89.92,8.25 90 bottom
U$90  [PPS5]  84.84,8.51 90 top
U$91  [PPS5]  84.84,8.51 90 bottom
U$92  [PPS0]  93.09,32.26 90 top
U$93  [FENCE2]  96.9,30.73 90 top
U$94  [RTK1]  95,32.13 90 top
U$95  [FENCE0]  79.76,8.64 90 top
U$96  [FENCE0]  79.76,8.64 90 bottom
U$97  [RTK1]  82.3,8.38 90 bottom
U$98  [RTK1]  82.3,8.38 90 top
U$99  [3V3-04]  74.68,43.69 90 bottom
U$100  [3V3-04]  74.68,43.69 90 top
U$101  [GND-04]  69.6,43.56 90 bottom
U$102  [GND-04]  69.6,43.56 90 top
U$103  [DSEL0]  81.79,17.4 0 bottom
U$104  [PWR-()-03]  91.19,31.88 90 top
U$105  [5V]  72.14,44.7 90 top
U$106  [5V]  72.14,44.7 90 bottom
U$107  [CS#-<]]  82.3,44.96 90 top
U$108  [CS#-<]]  82.3,44.96 90 bottom
U$109  [SCK-(]-04]  89.92,43.94 90 top
U$110  [SCK-(]-04]  89.92,43.94 90 bottom
U$111  [SFE_LOGO_FLAME_.1]  79.63,41.91 0 top
U$112  [RX#MOSI3]  84.84,41.27 90 bottom
U$113  [TX#MISO1]  87.38,41.15 90 bottom
U$114  [GND3]  57.78,28.45 0 top
U$115  [3V3-04]  57.66,33.53 0 top
U$116  [3V3-04]  62.36,33.53 0 bottom
U$117  [GND3]  62.61,28.45 0 bottom
U$118  [CORRECTION0]  55.25,43.43 0 top
U$119  [RTCM5]  56.39,44.7 0 top
U$120  [ZED#F9P6]  84.07,23.37 0 bottom
U$121  [RTCM5]  62.36,44.7 0 bottom
U$122  [CORRECTION0]  64.52,43.43 0 bottom
U$123  [RX#MOSI3]  84.84,41.27 90 top
U$124  [TX#MISO1]  87.38,41.15 90 top
U$125  [ACTIVE_L1#L21]  93.73,22.35 90 top
U$126  [ANTENNA2]  92.58,23.24 90 top
U$127  [RX20]  79.76,43.69 90 top
U$128  [RX22]  57.66,36.07 0 top
U$129  [TX21]  77.22,43.69 90 top
U$130  [TX23]  57.66,38.61 0 top
U$131  [TX21]  77.22,43.69 90 bottom
U$132  [RX20]  79.76,43.69 90 bottom
U$133  [TX21]  62.48,38.61 0 bottom
U$134  [RX20]  62.36,36.07 0 bottom
U$135  [GPS0]  63.63,42.93 0 top
U$136  [QWIIC_4MM]  64.52,13.46 0 top
U$137  [PPS1]  93.73,15.11 90 top
U$138  [PWR-()-03]  89.41,40 90 bottom
U$139  [PPS0]  91.82,40 90 bottom
U$140  [RTK1]  94.36,40 90 bottom
U$141  [FENCE2]  96.9,40 90 bottom
U$142  [PPS0]  89.92,14.61 0 top
U$143  [RTK#SMA4]  60.58,40.77 0 top
U$144  [PPS1]  93.73,18.67 270 bottom
U$145  [ANTENNA2]  93.73,29.21 270 bottom
U$146  [GPS#RTK#SMA5]  88.52,26.42 0 bottom
U$147  [SDA-[)]  28.45,52.2 90 top
U$148  [SCL-[)]  30.99,52.2 90 top
U$149  [SDA-[)]  28.45,52.2 90 bottom
U$150  [SCL-[)]  30.99,52.2 90 bottom
U$151  [3V3-04]  25.91,52.2 90 top
U$152  [3V3-04]  25.91,52.2 90 bottom
U$153  [GND-04]  23.37,52.2 90 top
U$154  [GND-04]  23.37,52.2 90 bottom
U$155  [I_SUPER2_C-()-03]  19.43,61.21 0 top
U$156  [INT8]  46.23,52.2 90 top
U$157  [INT8]  46.23,52.2 90 bottom
U$158  [U#BLOX3]  35.56,73.15 0 bottom
U$159  [#RST3]  41.15,51.94 90 top
U$160  [#RST3]  41.15,51.94 90 bottom
U$161  [#SAFE1]  43.69,51.94 90 top
U$162  [#SAFE1]  43.69,51.94 90 bottom
U$163  [PPS5]  38.61,52.2 90 top
U$164  [PPS5]  38.61,52.2 90 bottom
U$165  [PPS0]  46.86,75.95 90 top
U$166  [FENCE2]  50.67,74.42 90 top
U$167  [RTK1]  48.77,75.82 90 top
U$168  [FENCE0]  33.53,52.32 90 top
U$169  [FENCE0]  33.53,52.32 90 bottom
U$170  [RTK1]  36.07,52.07 90 bottom
U$171  [RTK1]  36.07,52.07 90 top
U$172  [3V3-04]  28.45,87.38 90 bottom
U$173  [3V3-04]  28.45,87.38 90 top
U$174  [GND-04]  23.37,87.25 90 bottom
U$175  [GND-04]  23.37,87.25 90 top
U$176  [DSEL0]  35.56,61.09 0 bottom
U$177  [PWR-()-03]  44.96,75.56 90 top
U$178  [5V]  25.91,88.39 90 top
U$179  [5V]  25.91,88.39 90 bottom
U$180  [CS#-<]]  36.07,88.65 90 top
U$181  [CS#-<]]  36.07,88.65 90 bottom
U$182  [SCK-(]-04]  43.69,87.63 90 top
U$183  [SCK-(]-04]  43.69,87.63 90 bottom
U$184  [SFE_LOGO_FLAME_.1]  33.4,85.6 0 top
U$185  [RX#MOSI3]  38.61,84.96 90 bottom
U$186  [TX#MISO1]  41.15,84.84 90 bottom
U$187  [GND3]  11.56,72.14 0 top
U$188  [3V3-04]  11.43,77.22 0 top
U$189  [3V3-04]  16.13,77.22 0 bottom
U$190  [GND3]  16.38,72.14 0 bottom
U$191  [CORRECTION0]  9.02,87.12 0 top
U$192  [RTCM5]  10.16,88.39 0 top
U$193  [ZED#F9P6]  37.85,67.06 0 bottom
U$194  [RTCM5]  16.13,88.39 0 bottom
U$195  [CORRECTION0]  18.29,87.12 0 bottom
U$196  [RX#MOSI3]  38.61,84.96 90 top
U$197  [TX#MISO1]  41.15,84.84 90 top
U$198  [ACTIVE_L1#L21]  47.5,66.04 90 top
U$199  [ANTENNA2]  46.36,66.93 90 top
U$200  [RX20]  33.53,87.38 90 top
U$201  [RX22]  11.43,79.76 0 top
U$202  [TX21]  30.99,87.38 90 top
U$203  [TX23]  11.43,82.3 0 top
U$204  [TX21]  30.99,87.38 90 bottom
U$205  [RX20]  33.53,87.38 90 bottom
U$206  [TX21]  16.26,82.3 0 bottom
U$207  [RX20]  16.13,79.76 0 bottom
U$208  [GPS0]  17.4,86.61 0 top
U$209  [QWIIC_4MM]  18.29,57.15 0 top
U$210  [PPS1]  47.5,58.8 90 top
U$211  [PWR-()-03]  43.18,83.69 90 bottom
U$212  [PPS0]  45.59,83.69 90 bottom
U$213  [RTK1]  48.13,83.69 90 bottom
U$214  [FENCE2]  50.67,83.69 90 bottom
U$215  [PPS0]  43.69,58.29 0 top
U$216  [RTK#SMA4]  14.35,84.45 0 top
U$217  [PPS1]  47.5,62.36 270 bottom
U$218  [ANTENNA2]  47.5,72.9 270 bottom
U$219  [GPS#RTK#SMA5]  42.29,70.1 0 bottom
U$220  [SDA-[)]  74.68,52.2 90 top
U$221  [SCL-[)]  77.22,52.2 90 top
U$222  [SDA-[)]  74.68,52.2 90 bottom
U$223  [SCL-[)]  77.22,52.2 90 bottom
U$224  [3V3-04]  72.14,52.2 90 top
U$225  [3V3-04]  72.14,52.2 90 bottom
U$226  [GND-04]  69.6,52.2 90 top
U$227  [GND-04]  69.6,52.2 90 bottom
U$228  [I_SUPER2_C-()-03]  65.66,61.21 0 top
U$229  [INT8]  92.46,52.2 90 top
U$230  [INT8]  92.46,52.2 90 bottom
U$231  [U#BLOX3]  81.79,73.15 0 bottom
U$232  [#RST3]  87.38,51.94 90 top
U$233  [#RST3]  87.38,51.94 90 bottom
U$234  [#SAFE1]  89.92,51.94 90 top
U$235  [#SAFE1]  89.92,51.94 90 bottom
U$236  [PPS5]  84.84,52.2 90 top
U$237  [PPS5]  84.84,52.2 90 bottom
U$238  [PPS0]  93.09,75.95 90 top
U$239  [FENCE2]  96.9,74.42 90 top
U$240  [RTK1]  95,75.82 90 top
U$241  [FENCE0]  79.76,52.32 90 top
U$242  [FENCE0]  79.76,52.32 90 bottom
U$243  [RTK1]  82.3,52.07 90 bottom
U$244  [RTK1]  82.3,52.07 90 top
U$245  [3V3-04]  74.68,87.38 90 bottom
U$246  [3V3-04]  74.68,87.38 90 top
U$247  [GND-04]  69.6,87.25 90 bottom
U$248  [GND-04]  69.6,87.25 90 top
U$249  [DSEL0]  81.79,61.09 0 bottom
U$250  [PWR-()-03]  91.19,75.56 90 top
U$251  [5V]  72.14,88.39 90 top
U$252  [5V]  72.14,88.39 90 bottom
U$253  [CS#-<]]  82.3,88.65 90 top
U$254  [CS#-<]]  82.3,88.65 90 bottom
U$255  [SCK-(]-04]  89.92,87.63 90 top
U$256  [SCK-(]-04]  89.92,87.63 90 bottom
U$257  [SFE_LOGO_FLAME_.1]  79.63,85.6 0 top
U$258  [RX#MOSI3]  84.84,84.96 90 bottom
U$259  [TX#MISO1]  87.38,84.84 90 bottom
U$260  [GND3]  57.78,72.14 0 top
U$261  [3V3-04]  57.66,77.22 0 top
U$262  [3V3-04]  62.36,77.22 0 bottom
U$263  [GND3]  62.61,72.14 0 bottom
U$264  [CORRECTION0]  55.25,87.12 0 top
U$265  [RTCM5]  56.39,88.39 0 top
U$266  [ZED#F9P6]  84.07,67.06 0 bottom
U$267  [RTCM5]  62.36,88.39 0 bottom
U$268  [CORRECTION0]  64.52,87.12 0 bottom
U$269  [RX#MOSI3]  84.84,84.96 90 top
U$270  [TX#MISO1]  87.38,84.84 90 top
U$271  [ACTIVE_L1#L21]  93.73,66.04 90 top
U$272  [ANTENNA2]  92.58,66.93 90 top
U$273  [RX20]  79.76,87.38 90 top
U$274  [RX22]  57.66,79.76 0 top
U$275  [TX21]  77.22,87.38 90 top
U$276  [TX23]  57.66,82.3 0 top
U$277  [TX21]  77.22,87.38 90 bottom
U$278  [RX20]  79.76,87.38 90 bottom
U$279  [TX21]  62.48,82.3 0 bottom
U$280  [RX20]  62.36,79.76 0 bottom
U$281  [GPS0]  63.63,86.61 0 top
U$282  [QWIIC_4MM]  64.52,57.15 0 top
U$283  [PPS1]  93.73,58.8 90 top
U$284  [PWR-()-03]  89.41,83.69 90 bottom
U$285  [PPS0]  91.82,83.69 90 bottom
U$286  [RTK1]  94.36,83.69 90 bottom
U$287  [FENCE2]  96.9,83.69 90 bottom
U$288  [PPS0]  89.92,58.29 0 top
U$289  [RTK#SMA4]  60.58,84.45 0 top
U$290  [PPS1]  93.73,62.36 270 bottom
U$291  [ANTENNA2]  93.73,72.9 270 bottom
U$292  [GPS#RTK#SMA5]  88.52,70.1 0 bottom
U$293  [SDA-[)]  28.45,95.89 90 top
U$294  [SCL-[)]  30.99,95.89 90 top
U$295  [SDA-[)]  28.45,95.89 90 bottom
U$296  [SCL-[)]  30.99,95.89 90 bottom
U$297  [3V3-04]  25.91,95.89 90 top
U$298  [3V3-04]  25.91,95.89 90 bottom
U$299  [GND-04]  23.37,95.89 90 top
U$300  [GND-04]  23.37,95.89 90 bottom
U$301  [I_SUPER2_C-()-03]  19.43,104.9 0 top
U$302  [INT8]  46.23,95.89 90 top
U$303  [INT8]  46.23,95.89 90 bottom
U$304  [U#BLOX3]  35.56,116.84 0 bottom
U$305  [#RST3]  41.15,95.63 90 top
U$306  [#RST3]  41.15,95.63 90 bottom
U$307  [#SAFE1]  43.69,95.63 90 top
U$308  [#SAFE1]  43.69,95.63 90 bottom
U$309  [PPS5]  38.61,95.89 90 top
U$310  [PPS5]  38.61,95.89 90 bottom
U$311  [PPS0]  46.86,119.63 90 top
U$312  [FENCE2]  50.67,118.11 90 top
U$313  [RTK1]  48.77,119.51 90 top
U$314  [FENCE0]  33.53,96.01 90 top
U$315  [FENCE0]  33.53,96.01 90 bottom
U$316  [RTK1]  36.07,95.76 90 bottom
U$317  [RTK1]  36.07,95.76 90 top
U$318  [3V3-04]  28.45,131.06 90 bottom
U$319  [3V3-04]  28.45,131.06 90 top
U$320  [GND-04]  23.37,130.94 90 bottom
U$321  [GND-04]  23.37,130.94 90 top
U$322  [DSEL0]  35.56,104.78 0 bottom
U$323  [PWR-()-03]  44.96,119.25 90 top
U$324  [5V]  25.91,132.08 90 top
U$325  [5V]  25.91,132.08 90 bottom
U$326  [CS#-<]]  36.07,132.33 90 top
U$327  [CS#-<]]  36.07,132.33 90 bottom
U$328  [SCK-(]-04]  43.69,131.32 90 top
U$329  [SCK-(]-04]  43.69,131.32 90 bottom
U$330  [SFE_LOGO_FLAME_.1]  33.4,129.29 0 top
U$331  [RX#MOSI3]  38.61,128.65 90 bottom
U$332  [TX#MISO1]  41.15,128.52 90 bottom
U$333  [GND3]  11.56,115.82 0 top
U$334  [3V3-04]  11.43,120.9 0 top
U$335  [3V3-04]  16.13,120.9 0 bottom
U$336  [GND3]  16.38,115.82 0 bottom
U$337  [CORRECTION0]  9.02,130.81 0 top
U$338  [RTCM5]  10.16,132.08 0 top
U$339  [ZED#F9P6]  37.85,110.74 0 bottom
U$340  [RTCM5]  16.13,132.08 0 bottom
U$341  [CORRECTION0]  18.29,130.81 0 bottom
U$342  [RX#MOSI3]  38.61,128.65 90 top
U$343  [TX#MISO1]  41.15,128.52 90 top
U$344  [ACTIVE_L1#L21]  47.5,109.73 90 top
U$345  [ANTENNA2]  46.36,110.62 90 top
U$346  [RX20]  33.53,131.06 90 top
U$347  [RX22]  11.43,123.44 0 top
U$348  [TX21]  30.99,131.06 90 top
U$349  [TX23]  11.43,125.98 0 top
U$350  [TX21]  30.99,131.06 90 bottom
U$351  [RX20]  33.53,131.06 90 bottom
U$352  [TX21]  16.26,125.98 0 bottom
U$353  [RX20]  16.13,123.44 0 bottom
U$354  [GPS0]  17.4,130.3 0 top
U$355  [QWIIC_4MM]  18.29,100.84 0 top
U$356  [PPS1]  47.5,102.49 90 top
U$357  [PWR-()-03]  43.18,127.38 90 bottom
U$358  [PPS0]  45.59,127.38 90 bottom
U$359  [RTK1]  48.13,127.38 90 bottom
U$360  [FENCE2]  50.67,127.38 90 bottom
U$361  [PPS0]  43.69,101.98 0 top
U$362  [RTK#SMA4]  14.35,128.14 0 top
U$363  [PPS1]  47.5,106.05 270 bottom
U$364  [ANTENNA2]  47.5,116.59 270 bottom
U$365  [GPS#RTK#SMA5]  42.29,113.79 0 bottom
U$366  [SDA-[)]  74.68,95.89 90 top
U$367  [SCL-[)]  77.22,95.89 90 top
U$368  [SDA-[)]  74.68,95.89 90 bottom
U$369  [SCL-[)]  77.22,95.89 90 bottom
U$370  [3V3-04]  72.14,95.89 90 top
U$371  [3V3-04]  72.14,95.89 90 bottom
U$372  [GND-04]  69.6,95.89 90 top
U$373  [GND-04]  69.6,95.89 90 bottom
U$374  [I_SUPER2_C-()-03]  65.66,104.9 0 top
U$375  [INT8]  92.46,95.89 90 top
U$376  [INT8]  92.46,95.89 90 bottom
U$377  [U#BLOX3]  81.79,116.84 0 bottom
U$378  [#RST3]  87.38,95.63 90 top
U$379  [#RST3]  87.38,95.63 90 bottom
U$380  [#SAFE1]  89.92,95.63 90 top
U$381  [#SAFE1]  89.92,95.63 90 bottom
U$382  [PPS5]  84.84,95.89 90 top
U$383  [PPS5]  84.84,95.89 90 bottom
U$384  [PPS0]  93.09,119.63 90 top
U$385  [FENCE2]  96.9,118.11 90 top
U$386  [RTK1]  95,119.51 90 top
U$387  [FENCE0]  79.76,96.01 90 top
U$388  [FENCE0]  79.76,96.01 90 bottom
U$389  [RTK1]  82.3,95.76 90 bottom
U$390  [RTK1]  82.3,95.76 90 top
U$391  [3V3-04]  74.68,131.06 90 bottom
U$392  [3V3-04]  74.68,131.06 90 top
U$393  [GND-04]  69.6,130.94 90 bottom
U$394  [GND-04]  69.6,130.94 90 top
U$395  [DSEL0]  81.79,104.78 0 bottom
U$396  [PWR-()-03]  91.19,119.25 90 top
U$397  [5V]  72.14,132.08 90 top
U$398  [5V]  72.14,132.08 90 bottom
U$399  [CS#-<]]  82.3,132.33 90 top
U$400  [CS#-<]]  82.3,132.33 90 bottom
U$401  [SCK-(]-04]  89.92,131.32 90 top
U$402  [SCK-(]-04]  89.92,131.32 90 bottom
U$403  [SFE_LOGO_FLAME_.1]  79.63,129.29 0 top
U$404  [RX#MOSI3]  84.84,128.65 90 bottom
U$405  [TX#MISO1]  87.38,128.52 90 bottom
U$406  [GND3]  57.78,115.82 0 top
U$407  [3V3-04]  57.66,120.9 0 top
U$408  [3V3-04]  62.36,120.9 0 bottom
U$409  [GND3]  62.61,115.82 0 bottom
U$410  [CORRECTION0]  55.25,130.81 0 top
U$411  [RTCM5]  56.39,132.08 0 top
U$412  [ZED#F9P6]  84.07,110.74 0 bottom
U$413  [RTCM5]  62.36,132.08 0 bottom
U$414  [CORRECTION0]  64.52,130.81 0 bottom
U$415  [RX#MOSI3]  84.84,128.65 90 top
U$416  [TX#MISO1]  87.38,128.52 90 top
U$417  [ACTIVE_L1#L21]  93.73,109.73 90 top
U$418  [ANTENNA2]  92.58,110.62 90 top
U$419  [RX20]  79.76,131.06 90 top
U$420  [RX22]  57.66,123.44 0 top
U$421  [TX21]  77.22,131.06 90 top
U$422  [TX23]  57.66,125.98 0 top
U$423  [TX21]  77.22,131.06 90 bottom
U$424  [RX20]  79.76,131.06 90 bottom
U$425  [TX21]  62.48,125.98 0 bottom
U$426  [RX20]  62.36,123.44 0 bottom
U$427  [GPS0]  63.63,130.3 0 top
U$428  [QWIIC_4MM]  64.52,100.84 0 top
U$429  [PPS1]  93.73,102.49 90 top
U$430  [PWR-()-03]  89.41,127.38 90 bottom
U$431  [PPS0]  91.82,127.38 90 bottom
U$432  [RTK1]  94.36,127.38 90 bottom
U$433  [FENCE2]  96.9,127.38 90 bottom
U$434  [PPS0]  89.92,101.98 0 top
U$435  [RTK#SMA4]  60.58,128.14 0 top
U$436  [PPS1]  93.73,106.05 270 bottom
U$437  [ANTENNA2]  93.73,116.59 270 bottom
U$438  [GPS#RTK#SMA5]  88.52,113.79 0 bottom

## Library data of the parts
B1-B6 = SparkFun-Batteries; PROD_ID: BATT-14267
C1 C12 C19 C26 C33 C40 = SparkFun-Capacitors; PROD_ID: CAP-08913
C2-C4 C6 C8 C9 C11 C13 C15 C16 C18 C20 C22 C23 C25 C27 C29 C30 C32 C34 C36 C37 C39 C41 = SparkFun-Capacitors; PROD_ID: CAP-00868
C5 C7 C10 C14 C17 C21 C24 C28 C31 C35 C38 C42 = SparkFun-Capacitors; PROD_ID: CAP-00810
D1 D5 D11 D16 D21 D26 = SparkFun-LED; PROD_ID: DIO-09003
D2 D7 D12 D17 D22 D27 = SparkFun-DiscreteSemi; PROD_ID: DIO-10955
D3 D8 D13 D18 D23 D28 = SparkFun-LED; PROD_ID: DIO-00821
D4 D9 D14 D19 D24 D29 = SparkFun-LED; PROD_ID: DIO-08575
D6 D10 D15 D20 D25 D30 = SparkFun-IC-Power; PROD_ID: DIO-14084
E1-E12 = SparkFun-RF; PROD_ID: CONN-08289
E$1-E$4 LOGO1-LOGO12 U$30 U$33 U$111 U$136 U$184 U$209 U$257 U$282 U$330 U$355 U$403 U$428 = SparkFun-Aesthetics
E$5 E$6 = SparkFun-Retired
FB1-FB6 = SparkFun-Coils; MFG_PART: BLM15HB121SN1D; PROD_ID: NDUC-14206
FENCE FENCE1-FENCE5 JP5 JP6 JP15 JP25 JP35 JP45 PPS PPS1-PPS5 PPS_LED PPS_LED1-PPS_LED5 PWR PWR1-PWR5 RTK RTK1-RTK5 SPI SPI1-SPI5 = SparkFun-Jumpers
J1 J7 J12 J14 J19 J21 J26 J28 J33 J35 J40 J42 = SparkFun-Connectors
J2 J4 J8 J10 J15 J17 J22 J24 J29 J31 J36 J38 = SparkFun-Connectors; PROD_ID: CONN-13694
J3 J9 J16 J23 J30 J37 = SparkX
J5 J11 J18 J25 J32 J39 = SparkFun-Connectors; PROD_ID: CONN-14122
J6 J13 J20 J27 J34 J41 = SparkFun-Connectors; PROD_ID: CONN-08437
JP1-JP4 JP7-JP14 JP16-JP24 JP26-JP34 JP36-JP44 JP46-JP49 JP61 JP71 JP81 JP91 JP101 = SparkFun
LED1-LED6 = SparkFun-LED; PROD_ID: DIO-00819
R1 R5 R11-R13 R30 R31 R34 R37 R38 R55 R56 R59 R62 R63 R80 R81 R84 R87 R88 R105 R106 R109 R112 R113 R130 R131 R134 R137 R138 = SparkFun-Resistors; PROD_ID: RES-07856
R2-R4 R6 R18-R27 R32 R33 R43-R52 R57 R58 R68-R77 R82 R83 R93-R102 R107 R108 R118-R127 R132 R133 R143-R150 = SparkFun-Resistors; PROD_ID: RES-08270
R7 R8 R28 R29 R53 R54 R78 R79 R103 R104 R128 R129 = SparkFun-Resistors; PROD_ID: RES-08272
R9 R10 R35 R36 R60 R61 R85 R86 R110 R111 R135 R136 = SparkFun-Resistors; PROD_ID: RES-09334
R14 R39 R64 R89 R114 R139 = SparkFun-Resistors; PROD_ID: RES-12581
R15 R40 R65 R90 R115 R140 = SparkFun-Resistors; PROD_ID: RES-07828
R16 R17 R41 R42 R66 R67 R91 R92 R116 R117 R141 R142 = SparkFun-Resistors; PROD_ID: RES-12083
U1 U2 U5 U7 U9 U11 = SparkFun-IC-Power; PROD_ID: VREG-12457
U3 U4 U6 U8 U10 U12 = ZED-F9P
U$1-U$10 U$12 U$18-U$20 U$23 U$24 U$38 U$41 U$46 U$60-U$64 U$66 U$67 U$77-U$82 U$99-U$102 U$104-U$110 U$115 U$116 U$138 U$147-U$155 U$172-U$175 U$177-U$183 U$188 U$189 U$211 U$220-U$228 U$245-U$248 U$250-U$256 U$261 U$262 U$284 U$293-U$301 U$318-U$321 U$323-U$329 U$334 U$335 U$357 U$366-U$374 U$391-U$394 U$396-U$402 U$407 U$408 U$430 = Labels
U$11 U$13 U$32 U$54 U$93 U$94 U$140 U$141 U$166 U$167 U$213 U$214 U$239 U$240 U$286 U$287 U$312 U$313 U$359 U$360 U$385 U$386 U$432 U$433 = buzzard_labels
U$14 U$17 U$28 U$29 U$95-U$98 U$168-U$171 U$241-U$244 U$314-U$317 U$387-U$390 = buzzard_labels (1)
U$15 U$16 U$22 U$83-U$85 U$156-U$158 U$229-U$231 U$302-U$304 U$375-U$377 = buzzard_labels (5)
U$21 U$42 U$50 U$51 U$55-U$58 U$127-U$134 U$200-U$207 U$273-U$280 U$346-U$353 U$419-U$426 = buzzard_labels (10)
U$25 U$52 U$72 U$92 U$139 U$142 U$165 U$212 U$215 U$238 U$285 U$288 U$311 U$358 U$361 U$384 U$431 U$434 = buzzard_labels (33)
U$26 U$31 U$34 U$37 U$112 U$113 U$123 U$124 U$185 U$186 U$196 U$197 U$258 U$259 U$269 U$270 U$331 U$332 U$342 U$343 U$404 U$405 U$415 U$416 = buzzard_labels (36)
U$27 U$103 U$176 U$249 U$322 U$395 = buzzard_labels (6)
U$35 U$36 U$39 U$40 U$43 U$44 U$86-U$91 U$159-U$164 U$232-U$237 U$305-U$310 U$378-U$383 = buzzard_labels (7)
U$45 U$48 U$49 U$53 U$59 U$68-U$70 U$76 U$114 U$117-U$122 U$135 U$146 U$187 U$190-U$195 U$208 U$219 U$260 U$263-U$268 U$281 U$292 U$333 U$336-U$341 U$354 U$365 U$406 U$409-U$414 U$427 U$438 = buzzard_labels (4)
U$47 U$74 U$137 U$144 U$210 U$217 U$283 U$290 U$356 U$363 U$429 U$436 = buzzard_labels (2)
U$65 U$71 U$75 U$125 U$126 U$145 U$198 U$199 U$218 U$271 U$272 U$291 U$344 U$345 U$364 U$417 U$418 U$437 = buzzard_labels (8)
U$73 U$143 U$216 U$289 U$362 U$435 = buzzard_labels (3)